# Altium PCB Tracker-NB-IOT-v1.0.PcbDoc (part 2 of 2)
Units mil, origin at the board's own origin, x right, y up, seen from the top; angles counter-clockwise.
Board outline 2362.21 x 1436.1 mil, 4 copper layers (Top Layer, Mid Layer 1, Mid Layer 2, Bottom Layer), stack 61.811 mil thick; 109 components, 87 nets, 397 pads, 55 vias.
Unrouted connection lines stored in the file: 161.
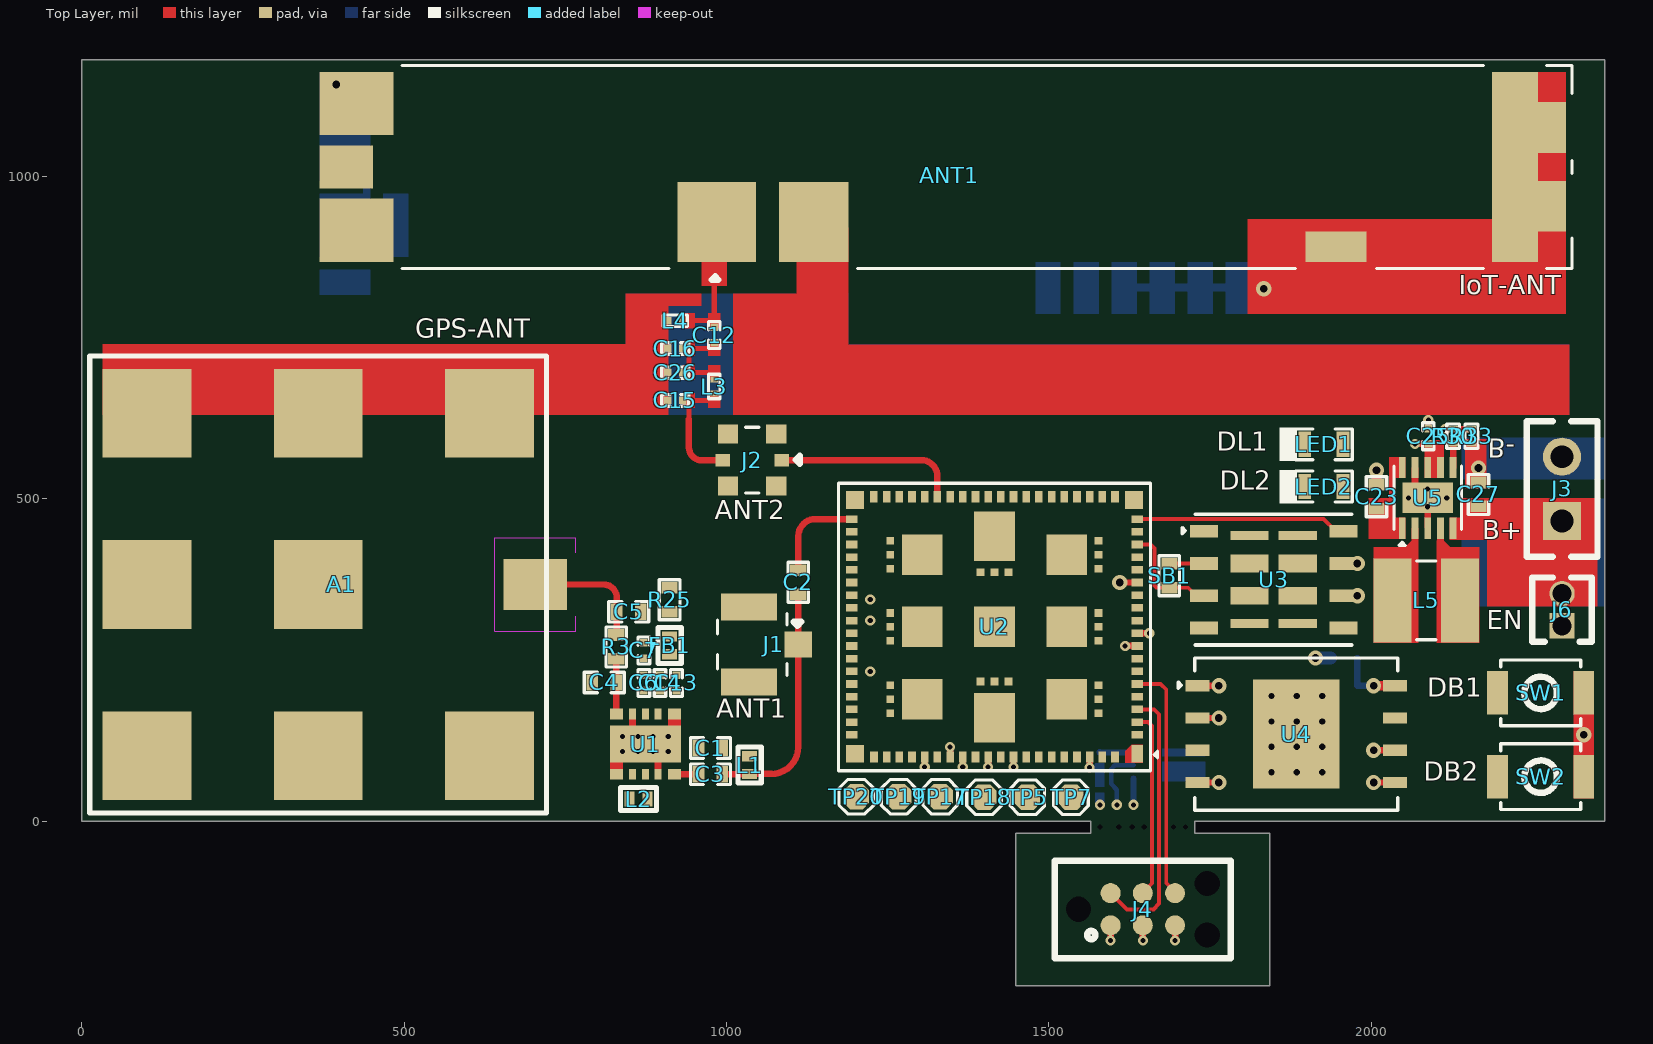
[diagram p0: Top Layer view]

## Part data (continued)
R6 R7 R8 R9 R10 R11 R12 R13 R14 R27: library part RC0201JR-070RL, "RES SMD 0 OHM JUMPER 1/20W 0201", Case Code (Imperial)=0201, Case Code (Metric)=0603, LCSC Part Number=C106228, Manufacturer=Yageo, Max Operating Temperature=125°C, Max Power Dissipation=50mW, Min Operating Temperature=-55°C, Package Quantity=10000, Resistance Tolerance=5%, Resistor Type="Thick Film", Supplier Part Number 1=311-0.0NCT-ND, Voltage Rating=25V, Case/Package=0201, Category="Chip SMD Resistors", ComponentLink1Description=https://datasheet.ciiva.com/7672/1563626-7672247.pdf?src-supplier=Element14, ComponentLink1URL=https://datasheet.ciiva.com/7672/1563626-7672247.pdf?src-supplier=Element14, ComponentLink2Description=https://datasheet.ciiva.com/7660/1421516-7660808.pdf?src-supplier=Element14, ComponentLink2URL=https://datasheet.ciiva.com/7660/1421516-7660808.pdf?src-supplier=Element14, ComponentLink3Description=https://datasheet.ciiva.com/7672/1563626-7672248.pdf?src-supplier=Element14, ComponentLink3URL=https://datasheet.ciiva.com/7672/1563626-7672248.pdf?src-supplier=Element14, ComponentLink4Description=https://datasheet.ciiva.com/16855/pyu-rc0201-51-rohs-l-8-16855994.pdf?src-supplier=Avnet+Europe, ComponentLink4URL=https://datasheet.ciiva.com/16855/pyu-rc0201-51-rohs-l-8-16855994.pdf?src-supplier=Avnet+Europe, ComponentLink5Description=https://datasheet.ciiva.com/28419/pyu-rc0201-51-rohs-l-8-28419660.pdf?src-supplier=Avnet+Europe, ComponentLink5URL=https://datasheet.ciiva.com/28419/pyu-rc0201-51-rohs-l-8-28419660.pdf?src-supplier=Avnet+Europe, ComponentLink6Description=https://datasheet.ciiva.com/46391/1421516-46391340.pdf?src-supplier=Element14, ComponentLink6URL=https://datasheet.ciiva.com/46391/1421516-46391340.pdf?src-supplier=Element14, ComponentLink7Description=https://datasheet.ciiva.com/8896/pyu-rc0201-51-rohs-l-8-8896143.pdf?src-supplier=Avnet, ComponentLink7URL=https://datasheet.ciiva.com/8896/pyu-rc0201-51-rohs-l-8-8896143.pdf?src-supplier=Avnet, Construction=Rectangular, Contact Plating=Tin,Matte, Depth=0.3mm, Features="Moisture Resistant", Height=0.01inch, Lead Free="Lead Free", Length=0.6mm, Manufacturer Part Number=RC0201JR-070RL, Military Standard=Not, Number of Terminations=2, Packaging="Tape and Reel", Power Rating=50mW, Pricing 1="1=0.10000, 10=0.03600, 25=0.02640, 50=0.02000, 100=0.01480, 250=0.01128, 500=0.00904, 1000=0.00665, 5000=0.00477 (USD)", Radiation Hardening=No, REACH SVHC=Unknown, Resistance=0R, RoHS=Yes, RoHS Compliant=Yes, Series=RC, Size Code=0201, Stock 1=11079, Supplier 1=Digi-Key, Termination=SMD/SMT, Tolerance=5%, Voltage Rating (DC)=25V, Weight=6E-06oz, Width=0.012inch
R15 R21: library part RC0201FR-071KL, "RES 1K OHM 1% 1/20W 0201", Case Code (Imperial)=0201, Case Code (Metric)=0603, LCSC Part Number=C138165, Manufacturer=Yageo, Max Operating Temperature=125°C, Max Power Dissipation=50mW, Min Operating Temperature=-55°C, Package Quantity=10000, Resistance Tolerance=1%, Resistor Type="Thick Film", Supplier Part Number=311-1KMCT-ND, Temperature Coefficient=200ppm/°C, Voltage Rating=25V, Case/Package=0201, Category="Chip SMD Resistors", ComponentLink1Description=https://datasheet.ciiva.com/7672/1563626-7672204.pdf?src-supplier=Element14, ComponentLink1URL=https://datasheet.ciiva.com/7672/1563626-7672204.pdf?src-supplier=Element14, ComponentLink2Description=https://datasheet.ciiva.com/22698/1563626-22698505.pdf?src-supplier=Element14, ComponentLink2URL=https://datasheet.ciiva.com/22698/1563626-22698505.pdf?src-supplier=Element14, ComponentLink3Description=https://datasheet.ciiva.com/29721/pyu-r-int-thick-7-29721196.pdf?src-supplier=Digi-Key, ComponentLink3URL=https://datasheet.ciiva.com/29721/pyu-r-int-thick-7-29721196.pdf?src-supplier=Digi-Key, ComponentLink4Description=https://datasheet.ciiva.com/29721/pyu-r-int-thick-7-29721195.pdf?src-supplier=Digi-Key, ComponentLink4URL=https://datasheet.ciiva.com/29721/pyu-r-int-thick-7-29721195.pdf?src-supplier=Digi-Key, ComponentLink5Description=https://datasheet.ciiva.com/8896/pyu-rc0201-51-rohs-l-8-8896174.pdf?src-supplier=Avnet, ComponentLink5URL=https://datasheet.ciiva.com/8896/pyu-rc0201-51-rohs-l-8-8896174.pdf?src-supplier=Avnet, Construction=Rectangular, Contact Plating=Tin,Matte, Depth=0.3mm, Features="Moisture Resistant", Height=0.01inch, Item Type=Resistor, Lead Free=5697LeadFree, Length=0.024inch, Manufacturer Part Number=RC0201FR-071KL, Military Standard=Not, Number of Terminations=2, Packaging="Tape and Reel", Power Rating=50mW, Pricing="1=0.1, 10=0.027, 50=0.0172, 100=0.0143, 500=0.00988, 1000=0.00854, 5000=0.00629 (USD)", Reach SVHC Compliant=Unknown, RoHS=Yes, RoHS Compliant=Yes, Series=RC, Stock=5606340, Supplier=Digi-Key, Technology="THICK FILM", Termination=SMD/SMT, Tolerance=1%, Voltage Rating (DC)=25V, Width=0.012inch, Working Voltage=25V
R16 R17: library part RC0201FR-07120RL, "RES 120 OHM 1% 1/20W 0201", LCSC Part Number=C295718, Manufacturer=Yageo, Supplier Part Number=311-120MCT-ND, Category="Chip SMD Resistors", ComponentLink1Description=https://datasheet.ciiva.com/2525/pyu-r-int-thick-7-2525064.pdf?src-supplier=Digikey, ComponentLink1URL=https://datasheet.ciiva.com/2525/pyu-r-int-thick-7-2525064.pdf?src-supplier=Digikey, ComponentLink2Description=https://datasheet.ciiva.com/22661/1563626-22661285.pdf?src-supplier=Element14, ComponentLink2URL=https://datasheet.ciiva.com/22661/1563626-22661285.pdf?src-supplier=Element14, ComponentLink3Description=https://datasheet.ciiva.com/2525/pyu-r-int-thick-7-2525062.pdf?src-supplier=Digikey, ComponentLink3URL=https://datasheet.ciiva.com/2525/pyu-r-int-thick-7-2525062.pdf?src-supplier=Digikey, ComponentLink4Description=https://datasheet.ciiva.com/2525/pyu-r-int-thick-7-2525063.pdf?src-supplier=Digikey, ComponentLink4URL=https://datasheet.ciiva.com/2525/pyu-r-int-thick-7-2525063.pdf?src-supplier=Digikey, Item Type=Resistor, Lead Free=5697LeadFree, Manufacturer Part Number=RC0201FR-07120RL, Pricing="1=0.1, 10=0.027, 50=0.0172, 100=0.0143, 500=0.00988, 1000=0.00854, 5000=0.00629 (USD)", RoHS=Yes, Stock=38339, Supplier=Digikey
R22 R23 R33: library part RC0201FR-071ML, "RES 1M OHM 1% 1/20W 0201", Case Code (Imperial)=0201, Case Code (Metric)=0603, LCSC Part Number=C295786, Manufacturer=Yageo, Max Operating Temperature=125°C, Max Power Dissipation=50mW, Min Operating Temperature=-55°C, Package Quantity=10000, Resistance Tolerance=1%, Resistor Type="Thick Film", Temperature Coefficient=200ppm/°C, Voltage Rating=25V, Case/Package=0201, ComponentLink1Description=https://datasheet.ciiva.com/29721/pyu-r-int-thick-7-29721005.pdf?src-supplier=Digikey, ComponentLink1URL=https://datasheet.ciiva.com/29721/pyu-r-int-thick-7-29721005.pdf?src-supplier=Digikey, ComponentLink2Description=https://datasheet.ciiva.com/29721/pyu-r-int-thick-7-29721006.pdf?src-supplier=Digikey, ComponentLink2URL=https://datasheet.ciiva.com/29721/pyu-r-int-thick-7-29721006.pdf?src-supplier=Digikey, ComponentLink3Description=https://datasheet.ciiva.com/7672/1563626-7672207.pdf?src-supplier=Element14, ComponentLink3URL=https://datasheet.ciiva.com/7672/1563626-7672207.pdf?src-supplier=Element14, ComponentLink4Description=https://datasheet.ciiva.com/22698/1563626-22698507.pdf?src-supplier=Element14, ComponentLink4URL=https://datasheet.ciiva.com/22698/1563626-22698507.pdf?src-supplier=Element14, ComponentLink5Description=https://datasheet.ciiva.com/25647/pyu-r-int-thick-7-25647311.pdf?src-supplier=Digikey, ComponentLink5URL=https://datasheet.ciiva.com/25647/pyu-r-int-thick-7-25647311.pdf?src-supplier=Digikey, Construction=Rectangular, Contact Plating=Tin,Matte, Depth=0.3mm, Features="Moisture Resistant", Height=0.01inch, Item Type=Resistor, Lead Free=5697LeadFree, Length=0.6mm, Manufacturer Part Number=RC0201FR-071ML, Military Standard=Not, Number of Terminations=2, Packaging="Tape and Reel", Power Rating=50mW, Pricing="1=0.104, 25=0.016, 100=0.008, 250=0.007, 1000=0.006 (USD)", Reach SVHC Compliant=Unknown, RoHS=Yes, RoHS Compliant=Yes, Series=RC, Stock=13025, Supplier=Avnet, Termination=SMD/SMT, Tolerance=1%, Voltage Rating (DC)=25V, Width=0.3mm
SB1: "Solder Bridge ON", Item Type="Solder Bridge", Manufacturer Part Number="Solder Bridge 0402"
SW1 SW2: "SWITCH TACTILE SPST-NO 0.05A 12V", Contact Current Rating=50mA, Contact Resistance=100mR, Insulation Resistance=100MR, LCSC Part Number=C231329, Manufacturer=Omron, Max Operating Temperature=70°C, Max Voltage Rating (DC)=12V, Min Operating Temperature=-25°C, Operating Force=1.5N, Package Quantity=1, Ratings="Dust Proof,IP40", Supplier Part Number 1=SW1020DKR-ND, Actuator Length=0.4mm, Actuator Type=Standard, ComponentLink1Description=http://www.farnell.com/datasheets/60838.pdf?src-supplier=Farnell, ComponentLink1URL=http://www.farnell.com/datasheets/60838.pdf?src-supplier=Farnell, ComponentLink2Description=http://www.farnell.com/datasheets/60838.pdf?src-supplier=Element14, ComponentLink2URL=http://www.farnell.com/datasheets/60838.pdf?src-supplier=Element14, ComponentLink3Description=https://omronfs.omron.com/en_US/ecb/products/pdf/en-b3u.pdf?src-supplier=Digi-Key, ComponentLink3URL=https://omronfs.omron.com/en_US/ecb/products/pdf/en-b3u.pdf?src-supplier=Digi-Key, ComponentLink4Description=http://www.omron.com/ecb/products/pdf/en-b3u.pdf?src-supplier=Digi-Key, ComponentLink4URL=http://www.omron.com/ecb/products/pdf/en-b3u.pdf?src-supplier=Digi-Key, ComponentLink5Description=https://www.distrelec.biz/Web/Downloads/he/et/B3U_eng_datasheet.pdf?mime=application%2Fpdf&src-supplier=Distrelec, ComponentLink5URL=https://www.distrelec.biz/Web/Downloads/he/et/B3U_eng_datasheet.pdf?mime=application%2Fpdf&src-supplier=Distrelec, ComponentLink6Description=http://www.onlinecomponents.com/productFiles/mf-OM/en-b3u.pdf?src-supplier=Onlinecomponents.com, ComponentLink6URL=http://www.onlinecomponents.com/productFiles/mf-OM/en-b3u.pdf?src-supplier=Onlinecomponents.com, ComponentLink7Description=https://www.verical.com/server-webapp/html/getDatasheet?partID=552554&src-supplier=Verical, ComponentLink7URL=https://www.verical.com/server-webapp/html/getDatasheet?partID=552554&src-supplier=Verical, ComponentLink8Description=http://www.farnell.com/datasheets/1685550.pdf?src-supplier=Element14, ComponentLink8URL=http://www.farnell.com/datasheets/1685550.pdf?src-supplier=Element14, ComponentLink9Description=http://www.farnell.com/datasheets/2610940.pdf?src-supplier=Farnell, ComponentLink9URL=http://www.farnell.com/datasheets/2610940.pdf?src-supplier=Farnell, ComponentLink10Description=https://www.alliedelec.com/m/d/4c8a9ef82804fc3c241a13c1e298fd73.pdf?src-supplier=Allied+Electronics, ComponentLink10URL=https://www.alliedelec.com/m/d/4c8a9ef82804fc3c241a13c1e298fd73.pdf?src-supplier=Allied+Electronics, Contact Material=Silver, Current Rating=50mA, Depth=2.5mm, Electrical Life=200000Cycles, Height=1.2mm, Illumination Type=Non-Illuminated,Illuminated, Item Type=Switch, Lead Free="Lead Free", Length=4mm, Manufacturer Part Number=B3U-1000P, Max Current Rating=50mA, Mechanical Life=200000Cycles, Mount="Surface Mount", Orientation=Straight, Packaging="Tape and Reel", Pricing 1="1=1, 10=0.961, 25=0.9064, 50=0.7976, 100=0.7251, 250=0.68888, 500=0.67074, 1000=0.52571 (USD)", REACH SVHC=Unknown, Stock 1=116454, Supplier 1=Digi-Key, Switch Function=Off-Mom, Switch Travel=0.15mm, Termination=SMD/SMT, Throw Configuration=SPST, Voltage Rating (DC)=12V, Weight=0.000776oz, Width=3mm
TP1 TP2 TP3 TP4 TP5 TP6 TP7 TP8 TP9 TP10 TP11 TP12 TP13 TP14 TP15 TP16 TP17 TP18 TP19 TP20 TP21 TP22: "Test Point ON", Item Type="Test Point", Manufacturer Part Number="TEST POINT 0.5mm Dia"
U1: "GNSS Low-Noise Amplifier Front-End Module with Integrated Pre-Filter and Post-Filter", Manufacturer=Skyworks, Supplier Part Number 1=863-2032-1-ND, Author=rsk, ComponentLink1Description=Datasheet, ComponentLink1URL=http://www.skyworksinc.com/uploads/documents/SKY65943_11_204404F.pdf, ComponentLink2Description="Supplier link", ComponentLink2URL=https://www.digikey.com/product-detail/en/skyworks-solutions-inc/SKY65943-11/863-2032-1-ND, Footprint Doc=MCM-10, HelpURL=http://www.skyworksinc.com/Product/3579/SKY65943-11, Item Type=Module, LatestRevisionDate=2019-04-16, Manufacturer Part Number=SKY65943-11, Note=N.A., Published=2019-04-16, Supplier 1=Digi-Key, Supplier 2=Mouser, Supplier Part Number 2=873-SKY65943-11
U2: "IC RF TXRX + MCU CELL", Manufacturer="Nordic Semiconductor", Part Number=nRF9151-LACAA0A, Part number IPS=N.A., Artikkelnr Noca=N.A., Author=kod1, Component Class=Nordic_Devices, Component Status=Active, ComponentLink1Description=Datasheet, ComponentLink1URL=N.A., ComponentLink2Description="Supplier link", ComponentLink2URL=N.A., Footprint Doc=LGA-113, HelpURL=N.A., LatestRevisionDate=2024-04-29, Manufacturer Part Number=NRF9151-LACA-R, Note=N.A., Pad Count=113, Part number Norautron=N.A., Published=2024-04-29, Supplier 1="Nordic Semiconductor", Supplier 2=N.A., Supplier Part Number 1=nRF9151-LACAA0A, Supplier Part Number 2=N.A.
U3: "E-SIM IC", Manufacturer=-, Package=MFFX, Item Type=IC, Manufacturer Part Number="MFFX-M2M UICC"
U4: "IC FLASH 256MBIT SPI/QUAD 8WSON", Manufacturer=GigaDevice, Supplier Part Number=1970-GD25WB256EYIGY-ND, Item Type=IC, Manufacturer Part Number=GD25WB256EYIGY, RoHS=No, Supplier=Digikey
U5: "IC REG BUCK BST 3.3V 900MA 10SON", LCSC Part Number=C15516, Manufacturer="Texas Instruments", ComponentLink1Description=https://datasheet.ciiva.com/2034/tps63030-2034702.pdf?src-supplier=Digikey, ComponentLink1URL=https://datasheet.ciiva.com/2034/tps63030-2034702.pdf?src-supplier=Digikey, ComponentLink2Description=https://datasheet.ciiva.com/3221/tps63030-3221513.pdf?src-supplier=Avnet, ComponentLink2URL=https://datasheet.ciiva.com/3221/tps63030-3221513.pdf?src-supplier=Avnet, Item Type=IC, Manufacturer Part Number=TPS63031DSKR, Pricing="1=2.33, 10=1.64, 50=1.64, 100=1.35, 1000=0.965, 10000=0.917 (USD)", RoHS=Yes, Stock=43441, Supplier=Mouser

## Free pads (board coordinates)
  round 0 hole 7.87 unplated: 1(1579.37,-9.36) 1(1608.6,-9.36) 1(1629.6,-9.36) 1(1648.21,-9.36) 1(1693.42,-9.36) 1(1712.04,-9.36)

## Via types
v1: diameter 15.75, hole 7.87, Top Layer to Bottom Layer, 28 vias
v2: diameter 23.62, hole 11.81, Top Layer to Bottom Layer, 15 vias
v3: diameter 19.68, hole 9.84, Top Layer to Bottom Layer, tented both sides, 12 vias

## Nets (pads, with @x,y where several pads share a name; then routed paths per layer and width w, separated by ;. In a path a pad name is that pad's centre, name@x,y a point inside that pad or via, vN(x,y) a via of type N, cw(c..) or ccw(c..) an arc to the next point about the centre after c; other vN are vias at no path point)
ANT: C15.2 J2.2 L3.1 | length 107.7
  Top Layer w10: 941.82,623.59 941.82,579.58 ccw(c961.4,579.58) 961.4,560 987.91,560 J2.2
BUTTON1: SW1.1 U2.67 | length 15.5
  Top Layer w10: U2.67 v1(1346.98,115)
BUTTON2: SW2.1 U2.68 | length 15.5
  Top Layer w10: v1(1366.63,84.11) U2.68
COEX0: R15.1 R22.2 TP9.1 U2.52
COEX1: TP10.1 U2.53
COEX2: R23.2 TP11.1 U2.54
  other v1: 1223.1,232.43
DEC0: C19.2 U2.24
GND: A1.2 ANT1.2 C1.1 C4.2 C5.2 C6.1 C7.1 C8.1 C9.1 C10.1 C11.1 C13.1 C14.1 C15.1 C16.1 C17.1 C18.1 C19.1 C20.1 C21.1 C22.1 C23.1 C24.1 C25.1 C26.1 C27.1 J1.2 J1.3 J2.3 J3.2 J4.5 L4.1 Q1.1 Q2.2 Q3.1 Q4.1 Q4.4 R20.1 R22.1 R23.1 R33.1 SW1.2 SW2.2 U1.1 U1.4 U1.6 U1.9 U1.11 U2.1 U2.7 U2.13 U2.15 U2.20 U2.25 U2.30 U2.34 U2.36 U2.38 U2.39 U2.40 U2.41 U2.43 U2.46 U2.51 U2.55 U2.60 U2.66 U2.71 U2.76 U2.105 U2.106 U2.107 U2.108 U2.109 U2.110 U2.111 U2.112 U2.113 U3.1 U4.4 U4.9 U5.3 U5.9 U5.11 U5.12 U5.13 U5.14 U5.15 | length 134.5
  Top Layer w10: v1(1695.99,-184.99) J4.5 ; U4.4 v2(1764,60) ; C25.1 v1(2088.89,622.13) ; SW1.2 SW1.2@2331,198.12
  Top Layer w15: C23.1 v2(2008.51,544.38)
  Bottom Layer w10: v1(1631.51,25.36) Q3.1@1631.51,66.19
  other v1: 1579.41,25.36 838.89,107.78 862.51,107.78 886.13,107.78 909.75,107.78 838.89,131.4 862.51,131.4 886.13,131.4 909.75,131.4
  other v2: 2330,134 2166.7,547.88
  other v3: 1845.61,75.94 1884.98,75.94 1924.35,75.94 1845.61,115.31 1884.98,115.31 1924.35,115.31 1845.61,154.68 1884.98,154.68 1924.35,154.68 1845.61,194.05 1884.98,194.05 1924.35,194.05
GPS_RF1: C2.1 U2.42 | length 149.1
  Top Layer w10: C2.1 1111.5,442.14 cw(c1138.01,442.14) 1138.01,468.65 U2.42@1192.41,468.65
GPS_RF2: C2.2 C3.2 J1.1 L1.1 | length 378.4
  Top Layer w10: C3.2 L1.1@1036,72.84 ; L1.1 1069.28,73.22 ccw(c1069.28,115.44) 1111.5,115.44 J1.1 C2.2
GPS_RF3: C3.1 U1.10 | length 37.4
  Top Layer w10: U1.10 C3.1
GPS_RF4: C4.1 R3.1 U1.5 | length 85.4
  Top Layer w10: U1.5 R3.1@829.3,251.76
GPS_RF5: A1.1 C5.1 R3.2 | length 186.2
  Top Layer w10: A1.1 809.35,367.15 cw(c809.35,346.5) 830,346.5 830,298.76
LED1: Q4.2 U2.56
LED2: Q4.5 U2.57
LTE_RF1: J2.1 U2.35 | length 287.8
  Top Layer w10: J2.1 1302.28,560 cw(c1302.28,535) 1327.28,535 U2.35
MAGPIO0: TP4.1 U2.21
MAGPIO1: TP6.1 U2.22
MAGPIO2: TP8.1 U2.23
MEM_CS: U2.2 U4.1 | length 33.3
  Top Layer w10: U4.1 v2(1764,210)
MEM_MISO: U2.72 U4.2 | length 48.8
  Top Layer w10: v1(1445.37,84.11) U2.72 ; U4.2 v2(1764,160)
MEM_MOSI: U2.70 U4.5 | length 48.8
  Top Layer w10: v1(1405.98,84.09) U2.70 ; v2(2004,60) U4.5
MEM_SCK: U2.73 U4.6 | length 33.3
  Top Layer w10: v2(2004,110) U4.6
MIPI_SCLK: TP2.1 U2.28
MIPI_SDATA: TP1.1 U2.27
MIPI_VIO: TP3.1 U2.29
NetANT1_1: ANT1.1 C12.2 L4.2
NetANT1_4: ANT1.3 ANT1.3_1 ANT1.3_2 ANT1.4 R10.2
  other v2: 1833.61,825.95
NetANT1_5: ANT1.5 R14.2
  other v2: 394.63,1142.87
NetC6_2: C6.2 C7.2 FB1.1 U1.3
NetC11_2: C11.2 FB2.2 R5.2 U2.14 | length 27.1
  Top Layer w10: v2(1610.17,370.21) U2.14
NetC12_1: C12.1 C16.2 C26.2 L3.2
NetC13_2: C13.2 C14.2 R15.2 U1.2
NetC20_2: C20.2 R21.2 U2.9 | length 18.7
  Top Layer w10: v1(1618.62,271.78) U2.9
NetC23_2: C23.2 C24.2 R24.1 R25.1 R26.1 R28.1 U5.1 U5.10 | length 102.6
  Top Layer w10: 2024.51,482.38 2032.74,490.61 2032.74,536.88 ; 2038.6,537.11 2048.2,537.11 2048.52,537.43 U5.10
  Bottom Layer w20: v2(1913.78,253.11) R24.1@1937.22,253.11
NetJ4_3: J4.3 R27.2 | length 23.4
  Top Layer w10: v1(1645.99,-184.99) J4.3
NetJ6_1: J6.1 R30.2 R33.2 | length 586.8
  Top Layer w10: v1@2114.17,607.93 v1(2115.17,607.93) R30.2
  Mid Layer 2 w10: v1(2115.17,607.93) 2332.65,607.93 2347.25,593.33 2347.25,312.98 2337.27,303 J6.1
NetL2_1: L2.1 U1.7
NetL2_2: L2.2 U1.8
NetL5_1: L5.1 U5.4
NetL5_2: L5.2 U5.2
NetLED1_1: LED1.1 R16.1
NetLED1_2: LED1.2 Q4.6
NetLED2_1: LED2.1 R17.1
NetLED2_2: LED2.2 Q4.3
NetQ1_3: Q1.3 Q1.6 Q2.1
NetQ1_4: Q1.4 R1.1 R4.2
NetQ3_3: Q3.3 R19.2 | length 52.5
  Bottom Layer w10: R19.2 1579.16,106.54 1631.43,106.54 Q3.3
NetQ3_5: Q3.5 Q3.6 R18.1
NetR5_1: R5.1 U2.10 | length 18.7
  Top Layer w10: U2.10 v1(1656.02,291.47)
NetR6_2: R6.2 R7.1
NetR7_2: R7.2 R8.1
NetR8_2: R8.2 R9.1
NetR9_2: R9.2 R10.1
NetR11_2: R11.2 R12.1
NetR12_2: R12.2 R13.1
NetR13_2: R13.2 R14.1
NetR30_1: R30.1 U5.6 | length 37.6
  Top Layer w10: U5.6 R30.1@2127.26,586.28
NetSB1_1: SB1.1 U3.2 | length 58.5
  Top Layer w6: SB1.1@1682.12,399.78 U3.2
NetTP12_1: TP12.1 U2.5
NetTP14_1: TP14.1 U2.8
NetTP15_1: TP15.1 U2.11
NetTP16_1: TP16.1 U2.12
NetTP21_1: TP21.1 U2.99
NetTP22_1: TP22.1 U2.101
nRESET: Q2.3 R2.1 R21.1
RESET: Q1.2 Q1.5 R2.2 R4.1 R27.1
SCL: R32.1 TP20.1 U2.50
  other v1: 1223.1,311.17
SDA: R31.1 TP19.1 U2.49
  other v1: 1223.1,344
SIM_1V8: U2.19 U3.8 | length 327.7
  Top Layer w6: U2.19 1926.51,468.65 1945.38,449.78 U3.8
SIM_CLK: U2.18 U3.6 | length 21.7
  Top Layer w6: U3.6 v2(1978.84,349.78)
SIM_IO: SB1.2 U2.17 U3.3 | length 170
  Top Layer w6: U2.17 1657.85,429.26 1663.96,423.15 1663.96,365.63 1667.47,362.11 1716.51,362.11 1728.84,349.78 U3.3
SIM_RST: U2.16 U3.7 | length 21.7
  Top Layer w6: U3.7 v2(1978.84,399.78)
SWDCLK: J4.4 U2.3 | length 290.6
  Top Layer w6: U2.3 1654.12,153.67 1660.23,147.56 1660.23,-96.23 1645.98,-110.48 J4.4
SWDIO: J4.2 U2.4 | length 420.2
  Top Layer w6: J4.2 1621.24,-136.9 1662.27,-136.9 1671.23,-127.94 1671.23,165.82 1663.7,173.36 U2.4
SWO: J4.6 pad.1@1693.42,-9.36 TP13.1 U2.6 | length 369.9
  Top Layer w6: U2.6 1673.59,212.73 1682.29,204.03 1682.29,-95.67 1695.98,-109.36 J4.6
UART1_CTS: TP7.1 U2.75
UART1_RTS: TP5.1 U2.74
UART1_RX: TP17.1 U2.44
UART1_TX: TP18.1 U2.45
VBAT: C22.2 C25.2 C27.2 J3.1 J6.2 Q3.4 R18.2 U5.5 U5.7 U5.8 | length 389.8
  Top Layer w10: v1(2068.24,585.26) 2087.89,585.26 U5.8
  Mid Layer 2 w10: v1(2068.24,585.26) 2220.87,585.26 2232.25,573.88 2232.25,478.59 2245.44,465.4 J3.1
VBAT_MEAS: R19.1 R20.2 U2.78 | length 43
  Top Layer w10: v1(1563.33,83.11) 1563.42,83.19 1563.42,99.47 U2.78
  Bottom Layer w10: v1(1563.33,83.11) 1576.8,83.11 1579.25,80.66 1579.25,71.58 ; R19.1@1578.77,82.28 R19.1@1579.09,81.96
VBAT_MEAS_EN: Q3.2 U2.58 | length 96.5
  Bottom Layer w7: v1(1605.6,25.36) 1605.6,48.92 1596.69,57.83 1596.69,80.92 1602.55,86.78 Q3.2
VDD: C21.2 J4.1 R1.2 R24.2 U4.8 | length 125
  Top Layer w10: v1(1596,-185) J4.1@1595.99,-161.65
  Top Layer w15: v2(2004,210) U4.8
  Bottom Layer w10: R24.2 C21.2 v2(2004,210)
VDD_GNSS: FB1.2 R25.2
VDD_GPIO: C1.2 C17.2 C18.2 L1.2 R16.2 R17.2 R28.2 R31.2 R32.2 U2.65 | length 15.5
  Top Layer w10: v1(1307.57,84.11) U2.65
VDD_nRF: C8.2 C9.2 C10.2 FB2.1 R26.2
pads on no net: ANT1.6 ANT1.7 J4.MP1 J4.MP2 J4.MP3 R6.1 R11.1 U1. U2.26 U2.31 U2.32 U2.33 U2.37 U2.47 U2.48 U2.59 U2.61 U2.62 U2.63 U2.64 U2.69 U2.77 U2.79 U2.80 U2.81 U2.82 U2.83 U2.84 U2.85 U2.86 U2.87 U2.88 U2.89 U2.90 U2.91 U2.92 U2.93 U2.94 U2.95 U2.96 U2.97 U2.98 U2.100 U2.102 U2.103 U2.104 U3.0 U3.4 U3.5 U4.3 U4.7

## Polygon pours and split planes (outlines as drawn)
GND on Mid Layer 1 "NONET_L02_P000" (solid, shelved, pour order 0): 0,739.96 0,543.35 0,0 1564.97,0 1564.97,-18.72 1448.85,-18.72 1448.85,-255 1842.55,-255 1842.55,-18.8 1726.52,-18.8 1726.52,0 2362.21,0 2362.21,630 2308,630 2308,739.96
GND on Mid Layer 2 "NONET_L03_P001" (solid, shelved, pour order 1): 0,739.96 0,543.35 0,0 1564.97,0 1564.97,-18.72 1448.85,-18.72 1448.85,-255 1842.55,-255 1842.55,-18.8 1726.52,-18.8 1726.52,0 2362.21,0 2362.21,630 2308,630 2308,739.96

## Other copper
Top Layer:
  rectangle net GND: 2313.98,35.14 2346.26,232.86
  rectangle net GND: 2145.85,516.38 2179.2,592.74
  rectangle net NetC23_2: 2027.64,532.11 2053.83,565.18
  rectangle net NetC23_2: 1996.01,438.02 2053.83,471.09
  rectangle net NetC23_2: 1996.01,438.02 2037.74,501
  rectangle net VBAT: 2180.12,333.31 2351.32,501
  region net GND: 2073.52,548.65 2062.89,548.65 2062.89,515.38 2073.52,515.38
  rectangle net GND: 2082.57,454.55 2093.2,487.82
  region net NetL5_2: 2073.52,454.55 2062.89,454.55 2062.89,432.67 2073.52,432.67
  rectangle net NetL5_1: 2102.26,432.67 2112.89,454.55
  rectangle net NetJ6_1: 2120.13,602.62 2163.14,613.25
  rectangle net VBAT: 2082.57,532.11 2112.89,591.17
  rectangle net VBAT: 2137.67,435.87 2325.85,501
  rectangle net VBAT: 2121.94,435.87 2296.32,471.09
  region net ANT: 945.76,624.07 945.76,643.2 937.88,643.2 937.88,624.07
  region net NetANT1_4: 2302.11,786.57 2302.11,934.2 1808.02,934.2 1808.02,786.57
  region net GND: 2308.02,630 2308.02,739.76 1010,739.76 1010,630
  region net GND: 910,630 910,739.96 32.04,739.96 32.04,630
  region net GND: 910,730.11 910,808.42 843.45,808.42 843.45,730.11
  region net GND: 961.4,799.01 961.4,818.69 843.45,818.69 843.45,799.01
  region net GND: 1189.12,732.06 1189.12,818.69 1010,818.69 1010,732.06
  region net NetANT1_1: 1000.77,830.5 1000.77,913.21 961.4,913.21 961.4,830.5
  region net NetANT1_1: 951.56,764.64 951.56,788.26 931.87,788.26 931.87,764.64
  region net NetC12_1: 951.56,721.33 951.56,744.95 931.87,744.95 931.87,721.33
  region net NetC12_1: 951.56,684.09 951.56,707.71 931.87,707.71 931.87,684.09
  region net ANT: 951.56,640.78 951.56,664.4 931.87,664.4 931.87,640.78
  region net NetC12_1: 945.65,704.95 945.65,734.16 937.78,734.16 937.78,704.95
  region net NetC12_1: 990.93,691.96 990.93,699.83 931.87,699.83 931.87,691.96
  region net NetC12_1: 990.93,721.33 990.93,744.95 971.24,744.95 971.24,721.33
  region net NetC12_1: 990.93,684.09 990.93,707.71 971.24,707.71 971.24,684.09
  region net NetANT1_1: 990.93,772.51 990.93,780.39 931.87,780.39 931.87,772.51
  region net NetC12_1: 990.93,729.2 990.93,737.08 931.87,737.08 931.87,729.2
  region net ANT: 990.93,648.65 990.93,656.53 931.87,656.53 931.87,648.65
  region net NetANT1_1: 985.02,781.21 985.02,832.21 977.15,832.21 977.15,781.21
  region net ANT: 990.93,640.78 990.93,664.4 971.24,664.4 971.24,640.78
  region net NetANT1_1: 990.93,764.64 990.93,788.26 971.24,788.26 971.24,764.64
  region net NetANT1_4: 2302.11,918.21 2302.11,1162.55 2187.94,1162.55 2187.94,918.21
  region net GND: 1189.12,813.21 1189.12,921.11 1108.8,921.11 1108.8,813.21
  region net NetL5_1: 2112.77,435.12 2122.88,425 2167.7,425 2167.7,277.04 2102.26,277.04 2102.26,435.12
  region net NetL5_2: 2062.96,435.12 2052.84,425 2004.08,425 2004.08,277.04 2073.52,277.04 2073.52,435.12
  pour cut-out: 2308.37,630 2308.37,739.85 2362.23,739.85 2362.23,630
Bottom Layer:
  rectangle net GND: 1572.13,22.19 1586.69,44.85
  rectangle net NetQ3_5: 1675.41,61.19 1743.49,92.69
  rectangle net VBAT: 1675.41,100.56 1743.49,112.37
  rectangle net VBAT_MEAS: 1571.8,52.87 1586.69,90.28
  rectangle net GND: 2140.17,530.4 2362.21,594.93
  rectangle net VBAT: 2140.17,333.31 2362.21,500.4
  region net NetANT1_5: 447.78,993.26 447.78,1162.55 369.06,1162.55 369.06,993.26
  region net NetR9_2: 1754.87,786.57 1754.87,867.27 1715.5,867.27 1715.5,786.57
  region net GND: 2308.02,630 2308.02,739.95 363.22,739.95 363.22,630
  region: 1518.65,786.57 1518.65,867.27 1479.28,867.27 1479.28,786.57
  region: 1577.7,786.57 1577.7,867.27 1538.33,867.27 1538.33,786.57
  region net NetANT1_4: 1636.76,786.57 1636.76,867.27 1597.39,867.27 1597.39,786.57
  region net NetANT1_4: 1695.81,786.57 1695.81,867.27 1656.44,867.27 1656.44,786.57
  region net NetANT1_4: 1853.29,786.57 1853.29,867.27 1774.55,867.27 1774.55,786.57
  region net NetANT1_4: 1853.29,822 1853.29,833.81 1597.39,833.81 1597.39,822
  region net GND: 1189.12,724.2 1189.12,818.69 843.45,818.69 843.45,724.2
  region net NetANT1_5: 381.03,904.88 381.03,942.57 369.04,942.57 369.04,904.88
  region net NetANT1_5: 447.78,965.7 447.78,1002.12 435.97,1002.12 435.97,965.7
  region net NetANT1_5: 447.78,934.2 447.78,973.57 369.06,973.57 369.06,934.2
  region net NetANT1_5: 447.78,875.15 447.78,914.57 369.06,914.57 369.06,875.15
  region net NetANT1_5: 506.83,875.15 506.83,973.57 467.46,973.57 467.46,875.15
  region: 447.78,816.09 447.78,855.46 369.04,855.46 369.04,816.09
  pour cut-out: 2308.01,630 2308.01,739.95 2362.23,739.95 2362.23,630
Multi-Layer:
  pour cut-out: 363.13,1181.1 363.13,739.96 0,739.96 0,1181.1
  pour cut-out: 1313.65,941.41 1313.65,775.21 824.12,775.21 824.12,941.41

## Silkscreen, mask and mechanical layers (free items; w line width, h text height)
Top Overlay:
  lines w10: 2282.16,410.4 2241.32,410.4 2241.32,620.4 2282.16,620.4 ; 2310.49,410.4 2351.32,410.4 2351.32,620.4 2310.49,620.4
  text "IoT-ANT" at 2136.13,807.27 h50
  text "GPS-ANT" at 517.02,740.01 h50
  text "B-" at 2181.31,603.39 h50 r180
  text "DL1" at 1760.42,564.32 h50
  text "DL2" at 1765.66,503.89 h50
  text "ANT2" at 982.19,457.9 h50
  text "B+" at 2172.65,427.42 h50
  text "EN" at 2179.27,287.45 h50
  text "DB1" at 2087.08,182.66 h50
  text "ANT1" at 984.23,150.06 h50
  text "DB2" at 2082.05,52.58 h50
Board Outline:
  the board outline again, w10

## Dimensions
0,1181.1 to 0,0 on Top Layer
0,1181.1 to 2362.2,1181.1 on Top Layer